# Altium PCB IMX8MMLPD4-CPU2_FULLY_PREPLACED_FANOUT.PcbDoc (part 3 of 3)
Units mil, origin at the board's own origin, x right, y up, seen from the top; angles counter-clockwise.
Board outline 2729.93 x 2000.03 mil, 8 copper layers (L1_PS, L2_GND_1, L3_IN1, L4_GND_2, L5_PWR_1, L6_PWR_2, L7_GND_3, L8_SS), stack 46.1 mil thick; 228 components, 321 nets, 1593 pads, 372 vias.
Unrouted connection lines stored in the file: 857.
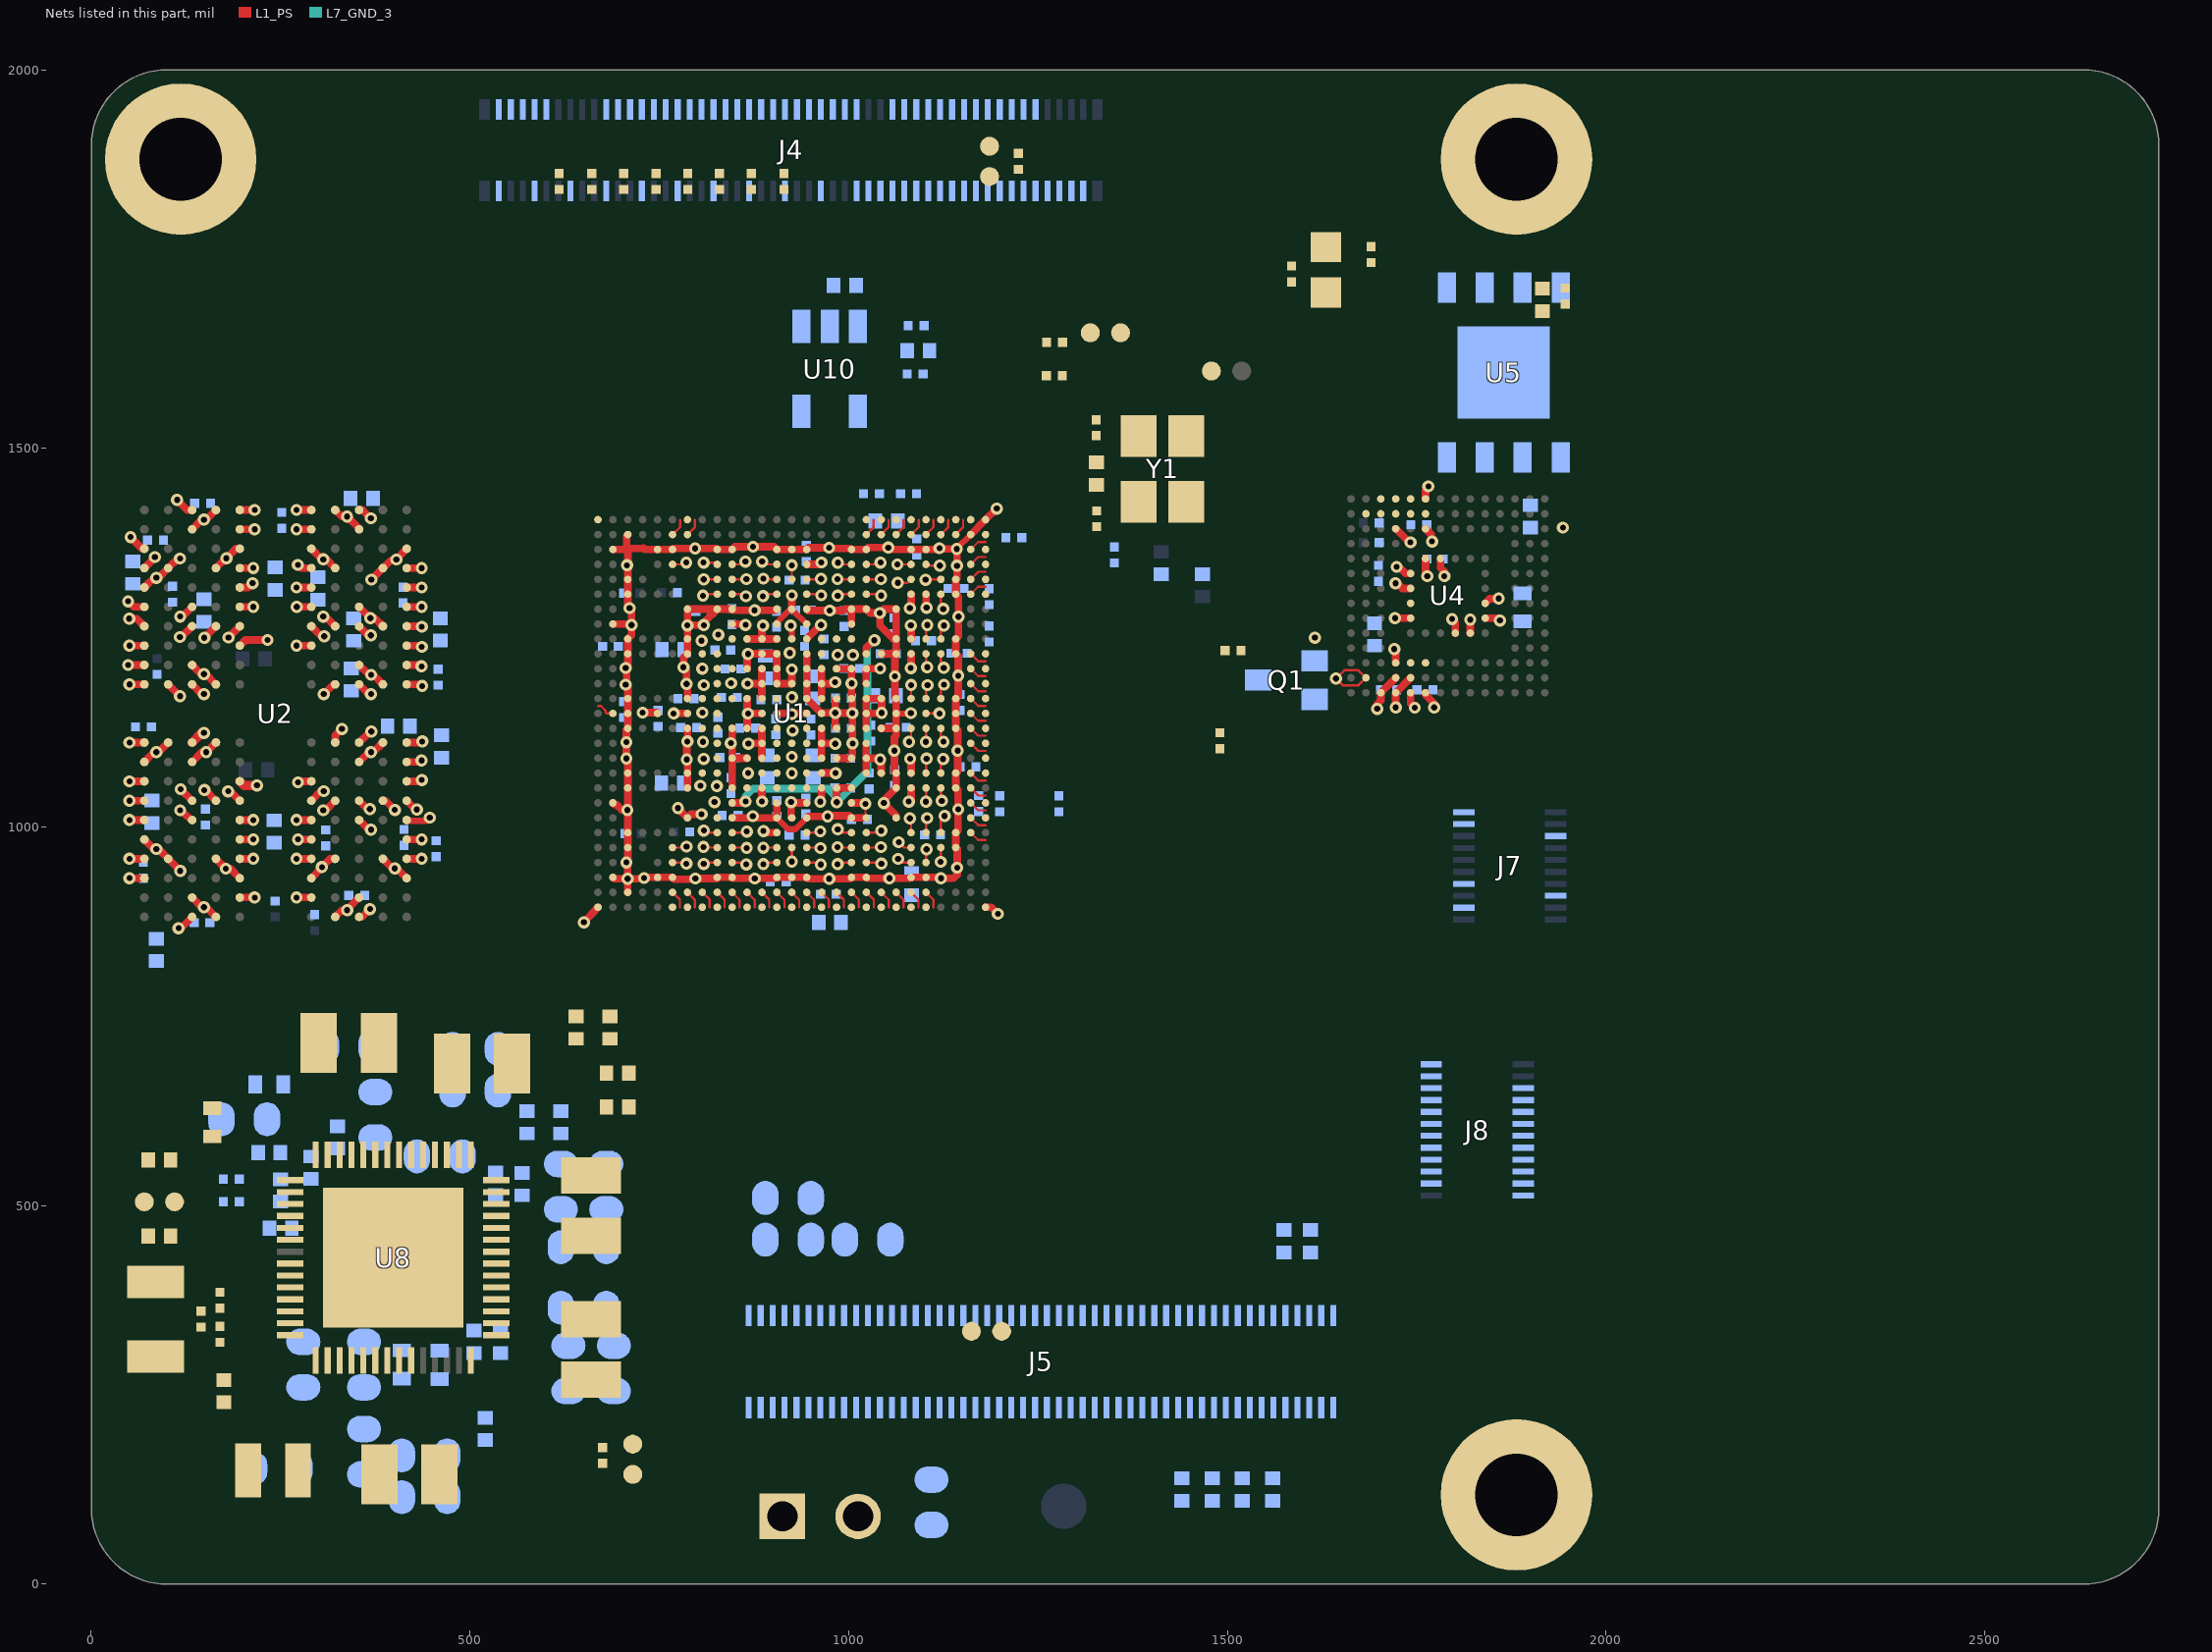
[diagram p5: the nets of this part, all layers, seen from the top]

## Via types
v1: diameter 16, hole 8, L1_PS to L8_SS, tented both sides, 325 vias
v2: diameter 16, hole 8, L1_PS to L8_SS, tented top, 47 vias

## Nets (pads, with @x,y where several pads share a name; then routed paths per layer and width w, separated by ;. In a path a pad name is that pad's centre, name@x,y a point inside that pad or via, vN(x,y) a via of type N, cw(c..) or ccw(c..) an arc to the next point about the centre after c; other vN are vias at no path point) (continued)
GND: BH1.1 BH2.1 BH3.1 C1.2 C2.2 C3.2 C5.2 C6.2 C8.2 C9.2 C10.2 C11.2 C12.2 C13.2 C15.2 C16.2 C17.2 C20.2 C21.2 C23.2 C30.2 C33.2 C35.2 C36.2 C48.2 C54.2 C55.2 C61.2 C65.2 C74.2 C78.2 C88.2 C89.2 C90.2 C91.2 C92.2 C93.2 C94.2 C95.2 C99.2 C100.2 C101.2 C104.2 C105.2 C106.2 C108.2 C109.2 C110.2 C111.2 C112.2 C113.2 C114.2 C115.2 C117.2 C118.2 C119.2 C123.2 C124.2 C127.2 C128.2 C129.2 C130.2 C131.2 C132.2 C133.2 C136.2 C137.2 C138.2 C139.2 C234.1 C235.2 C241.2 C244.2 C245.2 C247.2 C248.2 C251.2 C253.2 C254.2 C255.2 C256.2 C260.2 C264.2 C265.2 C266.2 C267.2 C268.2 C275.2 C279.1 C281.1 C283.2 C285.2 C287.2 C295.1 C298.2 C299.2 C301.1 C303.2 C304.2 C306.1 C307.1 C311.2 C312.2 C316.1 C317.2 C323.1 C324.2 C333.2 C337.2 C360.2 C363.2 C365.2 C370.2 C371.2 C372.2 C373.2 C374.2 C375.2 C376.2 C378.2 C379.2 C380.2 C381.2 C382.2 C384.2 C391.2 C392.2 C393.2 C394.2 C400.2 C401.1 C402.1 C403.2 C404.2 C405.2 C406.2 C407.1 C408.2 C410.2 J4.1 J4.7 J4.8 J4.13 J4.19 J4.20 J4.25 J4.31 J4.32 J4.37 J4.43 J4.44 J4.49 J4.55 J4.61 J4.67 J4.68 J4.73 J4.79 J4.80 J4.87 J4.92 J4.97 J5.9 J5.10 J5.11 J5.12 J5.13 J5.14 J5.15 J5.16 J5.17 J5.18 J5.19 J5.20 J5.47 J5.48 J5.60 J5.61 J5.72 J5.75 J5.84 J5.89 J5.96 J6.2 J7.3 J7.6 J7.7 J7.16 J7.17 J8.9 J8.10 J8.19 J8.20 Q1.2 R4.1 R7.1 R18.2 R23.2 R28.2 R29.2 R30.2 R103.2 R121.1 R122.1 R123.1 R124.1 R135.2 U1.A1 U1.A27 U1.AA7 U1.AA9 U1.AA10 U1.AA13 U1.AA15 U1.AA18 U1.AA19 U1.AA21 U1.AB3 U1.AB25 U1.AC3 U1.AC25 U1.AE2 U1.AE5 U1.AE6 U1.AE9 U1.AE10 U1.AE13 U1.AE14 U1.AE15 U1.AE18 U1.AE19 U1.AE22 U1.AE23 U1.AF3 U1.AG1 U1.AG27 U1.B3 U1.B26 U1.C2 U1.C5 U1.C6 U1.C9 U1.C10 U1.C13 U1.C14 U1.C15 U1.C18 U1.C19 U1.C22 U1.C23 U1.E3 U1.E25 U1.F3 U1.F25 U1.G7 U1.G9 U1.G10 U1.G13 U1.G15 U1.G18 U1.G19 U1.G21 U1.H2 U1.H18 U1.J3 U1.J7 U1.J21 U1.J25 U1.K3 U1.K7 U1.K20 U1.K21 U1.K25 U1.L12 U1.L16 U1.M12 U1.M16 U1.N3 U1.N7 U1.N12 U1.N16 U1.N21 U1.N25 U1.P3 U1.P13 U1.P15 U1.P21 U1.P25 U1.R3 U1.R7 U1.R12 U1.R16 U1.R20 U1.R21 U1.R25 U1.T12 U1.T16 U1.U12 U1.U16 U1.V3 U1.V7 U1.V21 U1.V25 U1.W3 U1.W7 U1.W21 U1.W25 U1.Y2 U1.Y13 U1.Y18 U2.A3 U2.A10 U2.AB3 U2.AB5 U2.AB8 U2.AB10 U2.C1 U2.C5 U2.C8 U2.C12 U2.D2 U2.D4 U2.D9 U2.D11 U2.E1 U2.E5 U2.E8 U2.E12 U2.G1 U2.G3 U2.G5 U2.G8 U2.G10 U2.G12 U2.J1 U2.J3 U2.J10 U2.J12 U2.K2 U2.K4 U2.K9 U2.K11 U2.N2 U2.N4 U2.N9 U2.N11 U2.P1 U2.P3 U2.P10 U2.P12 U2.T1 U2.T3 U2.T5 U2.T8 U2.T10 U2.T12 U2.V1 U2.V5 U2.V8 U2.V12 U2.W2 U2.W4 U2.W9 U2.W11 U2.Y1 U2.Y5 U2.Y8 U2.Y12 U4.A6 U4.C4 U4.E7 U4.G5 U4.H10 U4.J5 U4.K8 U4.N2 U4.N5 U4.P4 U4.P6 U5.4 U5.9 U8.5 U8.43 U8.57 U10.2 U10.4 Y1.2 Y1.4 | length 5097.9
  L1_PS w3: v1(1022.22,1030.58) 1022.22,1013.19 U1.AA19@1023.31,1012.1 ; v1(1643.48,1195.93) 1654.45,1206.9 1673,1206.9 U4.N2@1682.91,1196.99 1673.04,1187.12 1652.29,1187.12 v1(1643.48,1195.93)
  L1_PS w8: U1.AA13@905.21,1012.1 920.18,997.13 929.6,997.13 U1.AA15@944.57,1012.1 ; U1.P21@1062.69,1149.9 1081.68,1149.9 v1(1082.08,1150.3) ; v1(1142.66,1367.21) 1142.66,1367.67 U1.B26@1161.11,1386.12
  L1_PS w10: v1(48.68,1213.88) U2.P12@70.1,1213.88 ; v1(50.08,1275.14) 60.02,1275.14 U2.T12@70.1,1265.06 ; v1(50.41,932.38) U2.C12@70.1,932.38 ; v1(50.41,1034.74) U2.G12@70.1,1034.74 ; v1(51.89,1382.9) 67.37,1367.42 U2.Y12@70.1,1367.42 ; U2.E12@70.1,983.56 82.89,970.77 v1(85.85,970.77) 88.8,970.77 U2.D11@101.6,957.97 v2(117.5,942.07) ; U2.J12@70.1,1085.92 82.9,1098.72 v1(85.85,1098.72) 88.81,1098.72 U2.K11@101.6,1111.51 ; U2.V12@70.1,1316.24 82.89,1329.03 v1(85.85,1329.03) 88.8,1329.03 U2.W11@101.6,1341.83 114.31,1354.54 v2(117.22,1354.54) ; U2.N11@101.6,1188.29 v1(117.15,1172.74) ; v2(113.36,1431.9) 126.66,1418.6 U2.AB10@133.09,1418.6 ; v2(115.25,866.3) 118.19,866.3 U2.A10@133.09,881.2 ; v1(117.01,1250.89) 118.92,1250.89 U2.T10@133.09,1265.06 ; v1(118.03,1049.8) U2.G10@133.09,1034.74 ; U2.J10@133.09,1085.92 145.89,1098.72 v2(151.8,1098.72) U2.K9@164.59,1111.51 ; U2.P10@133.09,1213.88 145.07,1201.9 v2(148.89,1201.9) 149.71,1201.08 151.8,1201.08 U2.N9@164.59,1188.29 ; U2.D9@164.59,957.97 v2(177.64,944.92) 183.55,944.92 U2.C8@196.09,932.38 ; U2.W9@164.59,1341.83 177.64,1354.88 v2(178.41,1354.88) 190.95,1367.42 U2.Y8@196.09,1367.42 ; v1(180.76,1047.08) 183.75,1047.08 U2.G8@196.09,1034.74 ; v1(181.19,1250.16) U2.T8@196.09,1265.06 ; U2.E8@196.09,983.56 v1(213.84,983.56) ; U2.V8@196.09,1316.24 207.26,1316.24 v1(212.92,1321.9) ; U2.AB8@196.09,1418.6 v1(215.77,1418.6) ; v1(270.89,1316.24) U2.V5@290.57,1316.24 ; v1(270.89,1418.6) U2.AB5@290.57,1418.6 ; v1(272.82,983.56) U2.E5@290.57,983.56 ; U2.C5@290.57,932.38 304.47,946.28 v2(304.47,946.93) 315.51,957.97 U2.D4@322.07,957.97 ; U2.G5@290.57,1034.74 303.2,1047.37 v1(306.97,1047.37) ; U2.T5@290.57,1265.06 303.89,1251.74 v1(307.68,1251.74) ; U2.Y5@290.57,1367.42 304.59,1353.4 v2(306.19,1353.4) 310.5,1353.4 U2.W4@322.07,1341.83 ; v1(307,1175.49) 319.8,1188.29 U2.N4@322.07,1188.29 ; U2.K4@322.07,1111.51 322.07,1120.67 v1(330.86,1129.46) ; U2.A3@353.57,881.2 357.68,881.2 v1(368.01,891.53) ; U2.G3@353.57,1034.74 364.78,1023.53 v1(367.87,1023.53) ; U2.J3@353.57,1085.92 366.37,1098.72 v2(369.3,1098.72) 372.27,1098.72 U2.K2@385.06,1111.51 ; U2.P3@353.57,1213.88 366.37,1201.08 369.4,1201.08 v2(369.5,1200.98) 372.37,1200.98 U2.N2@385.06,1188.29 ; U2.T3@353.57,1265.06 365.56,1253.07 v1(369.24,1253.07) ; U2.AB3@353.57,1418.6 358.23,1418.6 v1(369.25,1407.58) ; v2(369.86,1326.63) U2.W2@385.06,1341.83 394.92,1351.69 398.24,1351.69 399.76,1353.21 v1(402.89,1353.21) 402.89,1353.75 U2.Y1@416.56,1367.42 ; U2.D2@385.06,957.97 397.85,945.18 v1(400.81,945.18) 403.76,945.18 U2.C1@416.56,932.38 ; U2.E1@416.56,983.56 v1(436.24,983.56) ; U2.G1@416.56,1034.74 428.23,1023.07 429.86,1023.07 v1(429.9,1023.03) ; U2.J1@416.56,1085.92 434.24,1085.92 v2(436.06,1087.74) ; U2.P1@416.56,1213.88 434.24,1213.88 v2(436.06,1212.06) ; U2.T1@416.56,1265.06 435.61,1265.06 v1(436.35,1264.32) ; U2.V1@416.56,1316.24 v1(436.24,1316.24) ; v1(650.54,874.07) U1.AG1@668.98,893.99 ; U1.AE2@688.67,933.36 690.5,931.53 v1(708.21,931.53) ; U1.Y2@688.67,1031.79 691.1,1029.36 693.62,1029.36 700.76,1022.22 v1(707.81,1022.22) ; U1.H2@688.67,1268.01 712.03,1268.01 v1(713.39,1266.65) ; U1.C2@688.67,1366.44 705.29,1366.44 706.77,1367.92 ; v1(707.31,1345.6) v1@708.35,1344.56 ; U1.AF3@708.35,913.68 708.21,913.82 v1(708.21,931.53) ; U1.B3@708.35,1386.12 706.77,1384.54 706.77,1367.92 ; v1(774.61,1024.87) 774.61,1024.58 U1.AA7@787.09,1012.1 791.72,1016.73 v1(805.89,1016.73) ; U1.W7@787.09,1051.48 U1.V7@787.09,1071.16 787.09,1088.14 v1(786.24,1088.99) 786.24,1112.05 v1(787.09,1112.9) U1.R7@787.09,1130.22 ; U1.N7@787.09,1169.58 787.09,1187.7 v1(785.89,1188.9) 785.89,1206.9 v1(781.89,1210.9) 781.89,1223.44 U1.K7@787.09,1228.64 U1.J7@787.09,1248.32 v1(787.09,1266.17) ; U1.AA10@846.15,1012.1 871.44,1012.1 v1(873.5,1014.16) 875.56,1012.1 U1.AA13@905.21,1012.1 U1.Y13@905.21,1031.79 ; v1(866.44,1189.27) U1.M12@885.52,1189.27 ; v1(867.54,1109.96) 868.11,1110.53 U1.T12@885.52,1110.53 ; U1.U12@885.52,1090.84 U1.T12@885.52,1110.53 ; U1.R12@885.52,1130.22 U1.T12@885.52,1110.53 ; U1.N12@885.52,1169.58 U1.M12@885.52,1189.27 ; U1.L12@885.52,1208.96 U1.M12@885.52,1189.27 ; U1.P13@905.21,1149.9 924.23,1149.9 v1(925.04,1149.09) 925.85,1149.9 U1.P15@944.57,1149.9 ; U1.G13@905.21,1287.7 903.55,1286.04 v1(875.81,1286.04) 847.81,1286.04 U1.G10@846.15,1287.7 U1.G9@826.47,1287.7 ; U1.AA15@944.57,1012.1 946.35,1013.88 v1(972.2,1013.88) 973.2,1014.88 1000.85,1014.88 U1.AA18@1003.63,1012.1 U1.AA19@1023.31,1012.1 ; U1.G15@944.57,1287.7 946.39,1285.88 v1(974.96,1285.88) 992.84,1285.88 994.66,1287.7 U1.G18@1003.63,1287.7 ; U1.U16@964.26,1090.84 U1.T16@964.26,1110.53 ; U1.R16@964.26,1130.22 U1.T16@964.26,1110.53 ; U1.N16@964.26,1169.58 U1.M16@964.26,1189.27 ; U1.L16@964.26,1208.96 U1.M16@964.26,1189.27 ; v1(982.18,1191.15) 980.3,1189.27 U1.M16@964.26,1189.27 ; v1(982.4,1109.84) 981.71,1110.53 U1.T16@964.26,1110.53 ; U1.Y18@1003.63,1031.79 1021.01,1031.79 v1(1022.22,1030.58) ; U1.H18@1003.63,1268.01 U1.G18@1003.63,1287.7 ; U1.R20@1043,1130.22 U1.R21@1062.69,1130.22 ; U1.K20@1043,1228.64 U1.K21@1062.69,1228.64 ; U1.AA21@1062.69,1012.1 1062.69,1015.3 v1(1046.43,1031.56) 1046.43,1035.22 U1.W21@1062.69,1051.48 U1.V21@1062.69,1071.16 1060.27,1073.57 v1(1060.27,1100.65) 1060.27,1118.35 1062.69,1120.77 U1.R21@1062.69,1130.22 ; 1144.37,1007.92 1144.37,995.36 U1.AB25@1141.43,992.42 U1.AC25@1141.43,972.74 1143.26,970.9 v1(1143.26,946.08) 1143.26,937.14 1138.44,932.32 v1(1121.84,932.32) 1120.79,933.36 U1.AE23@1102.05,933.36 U1.AE22@1082.37,933.36 1081.25,932.27 v1(1053.8,932.27) 1024.4,932.27 U1.AE19@1023.31,933.36 U1.AE18@1003.63,933.36 1001.78,931.51 v1(974.35,931.51) 946.43,931.51 U1.AE15@944.57,933.36 U1.AE14@924.89,933.36 U1.AE13@905.21,933.36 903.93,932.09 876.14,932.09 v1(876.04,931.99) 875.94,932.09 847.43,932.09 U1.AE10@846.15,933.36 U1.AE9@826.47,933.36 825.04,931.94 v1(797.52,931.94) 796.56,930.98 769.79,930.98 U1.AE6@767.41,933.36 U1.AE5@747.73,933.36 730.65,933.36 v1(729.89,932.6) 728.82,931.53 v1(708.21,931.53) ; 1144.4,1007.95 1144.4,1022.32 1144.68,1022.6 v1(1144.68,1023.33) 1144.68,1025.06 1144.37,1025.37 1144.37,1048.53 U1.W25@1141.43,1051.48 U1.V25@1141.43,1071.16 1143.89,1073.62 v1(1143.89,1100.69) 1143.89,1127.75 U1.R25@1141.43,1130.22 U1.P25@1141.43,1149.9 U1.N25@1141.43,1169.58 1144.67,1172.83 v1(1144.67,1199.77) 1144.67,1225.4 U1.K25@1141.43,1228.64 U1.J25@1141.43,1248.32 1144.93,1251.82 v1(1144.93,1277.76) 1144.93,1303.88 U1.F25@1141.43,1307.38 U1.E25@1141.43,1327.06 1142.96,1328.59 v1(1142.96,1344.93) 1142.96,1366.91 v1(1142.66,1367.21) 1120.68,1367.21 v1(1119.86,1368.03) 1118.27,1366.44 U1.C23@1102.05,1366.44 U1.C22@1082.37,1366.44 1054.72,1366.44 v1(1052.24,1368.92) 1025.79,1368.92 U1.C19@1023.31,1366.44 U1.C18@1003.63,1366.44 1002.39,1367.68 975.18,1367.68 v1(974.11,1368.75) 946.89,1368.75 U1.C15@944.57,1366.44 U1.C14@924.89,1366.44 U1.C13@905.21,1366.44 901.51,1370.14 v1(873.8,1370.14) 849.85,1370.14 U1.C10@846.15,1366.44 U1.C9@826.47,1366.44 825.09,1367.81 v1(797.23,1367.81) 768.78,1367.81 U1.C6@767.41,1366.44 U1.C5@747.73,1366.44 730.92,1366.44 729.11,1368.25 728.78,1367.92 706.77,1367.92 ; U1.B26@1161.11,1386.12 U1.A27@1180.8,1405.81 v1(1195.49,1420.5) ; U1.AG27@1180.8,893.99 1188.24,893.99 v1(1197.01,885.22) ; v1(1721.33,1275.73) U4.J5@1741.97,1275.73 ; v1(1721.96,1321.79) 1724.27,1321.79 1730.96,1315.1 U4.G5@1741.97,1315.1 ; v1(1722.28,1157.86) U4.P4@1722.28,1177.31 U4.N5@1741.97,1196.99 ; U4.C4@1722.28,1393.84 1740.13,1375.99 v1(1741.72,1375.99) ; U4.P6@1761.65,1177.31 1761.65,1174.61 1773.14,1163.12 v1(1773.14,1157.71) ; U4.A6@1761.65,1433.21 1761.65,1444.35 1765.41,1448.11 v1(1765.41,1449.79) ; U4.E7@1781.34,1354.47 1781.34,1342.08 1786.48,1336.94 v1(1786.48,1331.16) ; v1(1796.79,1274.61) 1801.02,1270.38 U4.K8@1801.02,1256.05 ; U4.H10@1840.39,1295.42 1846.27,1301.3 1857.95,1301.3 v1(1858.22,1301.57) ; 706.77,1367.92 708.35,1366.34 v1@708.35,1344.56 ; v1(707.81,1022.22) 708.35,1021.68 U1.AB3@708.35,992.42 U1.AC3@708.35,972.74 708.35,954.97 v1(706.55,953.17) 708.21,951.51 v1(708.21,931.53) ; v1(707.81,1022.22) 708.35,1022.76 U1.W3@708.35,1051.48 U1.V3@708.35,1071.16 708.35,1085.47 706.86,1086.96 706.86,1088.51 706.64,1088.73 706.64,1090.24 v1(706.52,1090.36) v1(706.52,1111.9) 706.52,1128.39 U1.R3@708.35,1130.22 U1.P3@708.35,1149.9 U1.N3@708.35,1169.58 708.35,1185.17 v1(705.62,1187.9) 706.89,1189.17 706.89,1208.7 v1(705.65,1209.94) 708.35,1212.64 U1.K3@708.35,1228.64 U1.J3@708.35,1248.32 713.39,1253.36 v1(713.39,1266.65) ; v1@708.35,1344.56 U1.E3@708.35,1327.06 U1.F3@708.35,1307.38 708.35,1291.57 v1(710.84,1289.08) 713.39,1286.53 v1(713.39,1266.65) ; v1(787.09,1266.17) 787.47,1266.55 v1(808.81,1266.55) 808.81,1270.04 U1.G9@826.47,1287.7 ; v1(787.09,1266.17) U1.G7@787.09,1287.7 U1.G9@826.47,1287.7 ; U1.G18@1003.63,1287.7 U1.G19@1023.31,1287.7 1028.49,1282.52 v1(1041.12,1282.52) ; v1(1041.12,1282.52) 1046.3,1287.7 U1.G21@1062.69,1287.7 U1.J21@1062.69,1248.32 ; v1(1041.12,1282.52) 1041.12,1265.89 1058.69,1248.32 U1.J21@1062.69,1248.32 ; U1.R21@1062.69,1130.22 U1.P21@1062.69,1149.9 U1.N21@1062.69,1169.58 1061.04,1171.23 v1(1061.04,1198.96) 1061.04,1226.99 U1.K21@1062.69,1228.64 ; U1.K21@1062.69,1228.64 U1.J21@1062.69,1248.32
  other v1: 822.89,1032.9
GPIO1_IO01: J5.64 U1.AF14 | length 23.8
  L1_PS w3: U1.AF14@924.89,913.68 934.75,903.82 934.75,893.99
GPIO1_IO05: J5.62 U1.AF12 | length 23.7
  L1_PS w3: U1.AF12@885.52,913.68 895.22,903.98 895.22,893.99
GPIO1_IO06: J5.58 U1.AG11
GPIO1_IO07: J5.56 U1.AF11 | length 23.8
  L1_PS w3: U1.AF11@865.83,913.68 875.82,903.7 875.82,893.99
GPIO1_IO08: J5.54 U1.AG10
GPIO1_IO09: J5.52 U1.AF10 | length 23.8
  L1_PS w3: U1.AF10@846.15,913.68 856.04,903.79 856.04,893.99
GPIO1_IO10: J5.50 U1.AD10 | length 19.7
  L1_PS w3: U1.AD10@846.15,953.05 862.35,953.05 v1(864.82,950.58)
GPIO1_IO11: J5.46 U1.AC10 | length 19.4
  L1_PS w3: U1.AC10@846.15,972.74 864.88,972.74 v1(865.33,972.28)
GPIO1_IO12: J5.44 U1.AB10 | length 20
  L1_PS w3: U1.AB10@846.15,992.42 863.94,992.42 v1(865.5,993.98)
GPIO1_IO13: J5.42 U1.AD9 | length 18.7
  L1_PS w3: v1(808.5,951.18) 810.36,953.05 U1.AD9@826.47,953.05
GPIO1_IO14: J5.40 U1.AC9 | length 18.4
  L1_PS w3: v1(808.37,973.5) 809.13,972.74 U1.AC9@826.47,972.74
GPIO1_IO15: J5.38 U1.AB9 | length 18.9
  L1_PS w3: v1(808.77,995.22) 811.57,992.42 U1.AB9@826.47,992.42
I2C1_SCL: R10.2 R48.1 U1.E9 | length 17.9
  L1_PS w3: v1(808.62,1327.06) U1.E9@826.47,1327.06
I2C1_SDA: R11.2 R54.1 U1.F9 | length 19.6
  L1_PS w3: v1(807.68,1305.38) 809.68,1307.38 U1.F9@826.47,1307.38
I2C2_SCL: J4.22 R12.2 U1.D10 | length 19
  L1_PS w3: U1.D10@846.15,1346.75 859.98,1346.75 v1(863.67,1350.44)
I2C2_SDA: J4.24 R13.2 U1.D9 | length 19.1
  L1_PS w3: v1(808.41,1349.15) 824.07,1349.15 U1.D9@826.47,1346.75
I2C3_SCL: J4.26 R14.2 U1.E10 | length 18.9
  L1_PS w3: U1.E10@846.15,1327.06 864.64,1327.06 v1(864.93,1327.36)
I2C3_SDA: J4.28 R15.2 U1.F10 | length 19.3
  L1_PS w3: U1.F10@846.15,1307.38 861.61,1307.38 v1(864.35,1304.65)
I2C4_SCL: J4.30 R16.2 U1.D13 | length 21
  L1_PS w3: v1(885.75,1350.42) 889.42,1346.75 U1.D13@905.21,1346.75
I2C4_SDA: J4.34 R17.2 U1.E13 | length 18.3
  L1_PS w3: v1(887.28,1327.98) 888.2,1327.06 U1.E13@905.21,1327.06
JTAG_MOD: R23.1 U1.D27
JTAG_NTRST: J4.60 U1.C27
JTAG_TCK: J4.62 R18.1 U1.F26 | length 23.7
  L1_PS w3: U1.F26@1161.11,1307.38 1170.86,1317.13 1180.8,1317.13
JTAG_TDI: J4.54 U1.E27
JTAG_TDO: J4.52 U1.E26 | length 23.8
  L1_PS w3: U1.E26@1161.11,1327.06 1171.1,1337.05 1180.8,1337.05
JTAG_TMS: J4.58 U1.F27
LX1: L5.1 U8.36 U8.37
LX2: L6.1 U8.45 U8.46
LX3: L10.1 U8.31 U8.32
LX4: L11.1 U8.19 U8.20
LX5: L13.1 U8.15
M.2_32K_OUT: J5.37 R116.2
NC1: U1.J18
NetC245_1: C245.1 U1.R22 | length 19
  L1_PS w3: v1(1079.64,1112.35) 1082.37,1115.08 U1.R22@1082.37,1130.22
NetC268_1: C268.1 U1.D15 | length 20.4
  L1_PS w10: U1.D15@944.57,1346.75 961.38,1346.75 v1(963.95,1349.32)
NetD1_A: D1.A R125.2
NetD1_C: D1.C Q1.3
NetL15_1: L15.1 U8.50 U8.51
NetR7_2: R7.2 U1.P2 | length 25.1
  L1_PS w3: 668.98,1159.74 673.06,1159.74 678.82,1153.98 678.82,1151.65 680.58,1149.89 U1.P2@688.67,1149.9
NetR28_1: R28.1 U1.D19 | length 19.8
  L1_PS w3: U1.D19@1023.31,1346.75 1039.36,1346.75 1041.72,1349.11 v1(1042.09,1349.11)
NetR29_1: R29.1 U1.E19 | length 19.4
  L1_PS w3: U1.E19@1023.31,1327.06 1042.27,1327.06 v1(1042.59,1327.38)
NetR30_1: R30.1 U1.E22 | length 19.5
  L1_PS w3: v1(1064.78,1322.36) 1077.67,1322.36 U1.E22@1082.37,1327.06
NetR48_2: R48.2 U8.41
NetR51_2: R51.2 U8.39
NetR52_2: R52.2 U8.40
NetR54_2: R54.2 U8.42
NetR55_2: R55.2 R106.2 U8.28
NetR108_1: R108.1 U1.F22 | length 19.1
  L1_PS w10: v1(1080.89,1288.9) 1082.37,1290.38 U1.F22@1082.37,1307.38
NetR109_1: R109.1 U1.F23 | length 18.2
  L1_PS w10: U1.F23@1102.05,1307.38 1102.05,1290.4 v1(1102.9,1289.55)
NetR111_1: R111.1 U8.6
NetR114_1: R114.1 U8.9
NetR127_2: R127.2 U8.8
NetR146_2: R146.2 U8.12
NVCC_DRAM_1V1: C88.1 C89.1 C90.1 C91.1 C92.1 C93.1 C94.1 C95.1 C110.1 C111.1 C112.1 C113.1 C114.1 C115.1 C117.1 C118.1 C119.1 C324.1 C373.1 C374.1 C375.1 C376.1 C378.1 C379.1 C380.1 C381.1 C382.1 L15.2 R5.1 R6.1 U1.K8 U1.K9 U1.L9 U1.M9 U1.N8 U1.N9 U1.P7 U1.R8 U1.R9 U1.T9 U1.U9 U1.V8 U1.V9 U2.A4 U2.A9 U2.AA3 U2.AA5 U2.AA8 U2.AA10 U2.AB4 U2.AB9 U2.B3 U2.B5 U2.B8 U2.B10 U2.D1 U2.D5 U2.D8 U2.D12 U2.F3 U2.F5 U2.F8 U2.F10 U2.G2 U2.H1 U2.H5 U2.H8 U2.H12 U2.K1 U2.K3 U2.K10 U2.K12 U2.N1 U2.N3 U2.N10 U2.N12 U2.R1 U2.R5 U2.R8 U2.R12 U2.T2 U2.U3 U2.U5 U2.U8 U2.U10 U2.W1 U2.W5 U2.W8 U2.W12 U8.52 | length 970.5
  L1_PS w10: v1(50.41,957.97) U2.D12@70.1,957.97 ; v1(50.41,1060.33) U2.H12@70.1,1060.33 ; v1(50.41,1111.51) U2.K12@70.1,1111.51 ; v1(50.41,1188.29) U2.N12@70.1,1188.29 ; v1(50.41,1239.47) U2.R12@70.1,1239.47 ; U2.W12@70.1,1341.83 84.04,1355.77 v1(84.04,1356.43) ; v1(117.34,1021.95) U2.F10@133.09,1009.15 ; v1(117.34,1277.85) 120.29,1277.85 U2.U10@133.09,1290.65 ; U2.B10@133.09,906.79 145.89,893.99 v1(148.84,893.99) 151.8,893.99 U2.A9@164.59,881.2 ; U2.N10@133.09,1188.29 145.89,1175.49 v1(148.84,1175.49) ; U2.AA10@133.09,1393.01 145.89,1405.81 v1(148.84,1405.81) 151.8,1405.81 U2.AB9@164.59,1418.6 ; U2.B8@196.09,906.79 v1(215.77,906.79) ; U2.D8@196.09,957.97 v1(213.84,957.97) ; U2.F8@196.09,1009.15 v1(213.84,1009.15) ; U2.R8@196.09,1239.47 203.52,1246.9 v1(232.65,1246.9) ; U2.U8@196.09,1290.65 v1(213.84,1290.65) ; U2.W8@196.09,1341.83 213.64,1341.83 v1(213.84,1342.03) ; U2.AA8@196.09,1393.01 v1(215.77,1393.01) ; v1(270.89,906.79) U2.B5@290.57,906.79 ; v1(270.89,957.97) U2.D5@290.57,957.97 ; v1(270.89,1009.15) U2.F5@290.57,1009.15 ; v1(270.89,1239.47) U2.R5@290.57,1239.47 ; v1(270.89,1393.01) U2.AA5@290.57,1393.01 ; v1(271.39,1290.65) U2.U5@290.57,1290.65 ; v1(272.81,1346) 276.98,1341.83 U2.W5@290.57,1341.83 ; v1(272.88,1058.86) 274.35,1060.33 U2.H5@290.57,1060.33 ; U2.A4@322.07,881.2 330.91,890.04 v1(337.94,890.04) 337.94,891.16 U2.B3@353.57,906.79 ; U2.AB4@322.07,1418.6 330.76,1409.91 v1(337.78,1409.91) 353.57,1394.12 U2.AA3@353.57,1393.01 ; U2.F3@353.57,1009.15 366.36,996.36 v1(369.31,996.36) ; U2.K3@353.57,1111.51 366.37,1124.31 368.06,1124.31 v1(369.83,1126.08) ; U2.N3@353.57,1188.29 366.37,1175.49 v1(369.31,1175.49) ; U2.U3@353.57,1290.65 v1(368.56,1275.66) 374.46,1275.66 U2.T2@385.06,1265.06 ; U2.G2@385.06,1034.74 388.61,1034.74 v1(400.81,1022.54) ; U2.D1@416.56,957.97 v1(436.24,957.97) ; U2.H1@416.56,1060.33 434.64,1060.33 v1(436.35,1062.04) ; U2.K1@416.56,1111.51 434.71,1111.51 436.14,1112.94 v1(437.04,1112.94) ; U2.N1@416.56,1188.29 434.71,1188.29 v1(436.83,1186.17) ; U2.R1@416.56,1239.47 434.64,1239.47 v1(436.35,1237.76) ; U2.W1@416.56,1341.83 v1(436.24,1341.83) ; v1(768.89,1149.9) U1.P7@787.09,1149.9
  L1_PS w12: U2.K10@133.09,1111.51 145.89,1124.31 v1(148.84,1124.31) ; U2.H8@196.09,1060.33 201.52,1054.9 v1(218.89,1054.9)
  other v1: 825.89,1053.9 804.18,1054.36 808.62,1089.9 807.54,1112.38 806.78,1151.05 808.72,1187.34 806.78,1209.14 805.89,1245.9 827.89,1253.9
NVCC_ENET: C2.1 C392.1 J7.19 U1.W22 | length 19.2
  L1_PS w10: v1(1079.41,1033.53) 1082.37,1036.49 U1.W22@1082.37,1051.48
NVCC_SD2: C17.1 C365.1 R119.1 R120.1 R133.1 U1.V22 U8.55 | length 19.4
  L1_PS w10: v1(1081.23,1090.09) 1082.37,1088.95 U1.V22@1082.37,1071.16
NVCC_SNVS_1V8: C333.1 C391.1 R20.1 R21.1 R102.1 U1.J22 U8.3 | length 17.9
  L1_PS w10: v1(1082.17,1266.18) 1082.37,1265.98 U1.J22@1082.37,1248.32
ONOFF: J4.46 R21.2 U1.A25
PCIE_CLK_N: J4.75 U1.A21
PCIE_CLK_P: J4.77 U1.B21 | length 23.7
  L1_PS w3: U1.B21@1062.69,1386.12 1072.39,1395.82 1072.39,1405.81
PCIE_RX_N: J4.63 U1.A19
PCIE_RX_P: J4.65 U1.B19 | length 23.7
  L1_PS w3: U1.B19@1023.31,1386.12 1033.02,1395.82 1033.02,1405.81
PCIE_TX_N: J4.69 U1.A20
PCIE_TX_P: J4.71 U1.B20 | length 23.7
  L1_PS w3: U1.B20@1043,1386.12 1052.71,1395.82 1052.71,1405.81
PDM_CLK: J5.65 U1.AC15 | length 18.6
  L1_PS w3: U1.AC15@944.57,972.74 962.18,972.74 v1(962.88,972.04)
PDM_DATA0: J5.67 U1.AD18 | length 19.2
  L1_PS w3: v1(985.36,950.88) 987.53,953.05 U1.AD18@1003.63,953.05
PDM_DATA1: J5.69 U1.AC14 | length 18.5
  L1_PS w4: v1(924.89,954.26) U1.AC14@924.89,972.74
PDM_DATA2: J5.71 U1.AD13 | length 18.8
  L1_PS w3: v1(887.32,950.87) 889.5,953.05 U1.AD13@905.21,953.05
PDM_DATA3: J5.73 U1.AC13 | length 17.9
  L1_PS w3: v1(887.35,972.58) 887.5,972.74 U1.AC13@905.21,972.74
PMIC_NINT: U1.AF13 U8.13 | length 23.8
  L1_PS w3: U1.AF13@905.21,913.68 915.16,903.72 915.16,893.99
PMIC_ON_REQ: J4.48 R51.1 U1.A24
PMIC_STBY_REQ: R52.1 U1.E24 | length 20.4
  L1_PS w3: v1(1101.58,1326.51) 1102.13,1327.06 U1.E24@1121.74,1327.06
POR_B: J4.50 R20.2 R114.2 U1.B24 | length 23.8
  L1_PS w3: U1.B24@1121.74,1386.12 1131.56,1395.93 1131.56,1405.81
QSPIA_DATA0: U1.P23 U5.5 | length 17.9
  L1_PS w3: U1.P23@1102.05,1149.9 v1(1119.9,1149.9)
QSPIA_DATA1: U1.K24 U5.2 | length 20
  L1_PS w3: U1.K24@1121.74,1228.64 1121.74,1213.9 v1(1125.48,1210.16)
QSPIA_DATA2: U1.K23 U5.3 | length 18.5
  L1_PS w3: U1.K23@1102.05,1228.64 1102.05,1212.48 v1(1103.67,1210.86)
QSPIA_DATA3: U1.N23 U5.7 | length 18.6
  L1_PS w3: U1.N23@1102.05,1169.58 1102.05,1185.11 v1(1104.24,1187.3)
QSPIA_NSS0: R37.2 U1.N24 U5.1 | length 20
  L1_PS w3: U1.N24@1121.74,1169.58 1121.74,1183.63 v1(1125.97,1187.86)
QSPIA_SCLK: U1.N22 U5.6 | length 17.9
  L1_PS w3: U1.N22@1082.37,1169.58 v1(1082.37,1187.47)
R_SNSP1: R142.2 R143.1 U8.38
R_SNSP2: R140.2 R141.1 U8.44
R_SNSP3_CFG: R144.2 R145.1 U8.30
REF_CLK_32K: R116.1 U1.AG14
RTC_RESET_B: R102.2 R111.2 U1.F24 | length 20.8
  L1_PS w3: U1.F24@1121.74,1307.38 1121.74,1291 v1(1124.88,1287.85)
SAI1_MCLK: J5.98 U1.AB18 | length 19.8
  L1_PS w3: v1(985.65,996.85) 990.08,992.42 U1.AB18@1003.63,992.42
SAI1_RXC: J5.76 U1.AF16 | length 23.7
  L1_PS w3: U1.AF16@964.26,913.68 973.97,903.97 973.97,893.99
SAI1_RXD0: J5.78 U1.AG15
SAI1_RXD1: J5.80 R76.1 U1.AF15 | length 23.8
  L1_PS w3: U1.AF15@944.57,913.68 954.56,903.7 954.56,893.99
SAI1_RXD2: J5.82 R75.1 U1.AG17
SAI1_RXD3: J5.86 U1.AF17 | length 23.7
  L1_PS w3: U1.AF17@983.95,913.68 993.65,903.98 993.65,893.99
SAI1_RXD4: J5.88 U1.AG18
SAI1_RXD5: J5.90 R72.1 U1.AF18 | length 23.8
  L1_PS w3: U1.AF18@1003.63,913.68 1013.61,903.7 1013.61,893.99
SAI1_RXD6: J5.92 R71.1 U1.AG19
SAI1_RXD7: J5.94 U1.AF19 | length 23.7
  L1_PS w3: U1.AF19@1023.31,913.68 1033.09,903.9 1033.09,893.99
SAI1_RXFS: J5.74 U1.AG16
SAI1_TXC: J5.81 U1.AC18 | length 18.6
  L1_PS w3: v1(985.28,973.38) 985.92,972.74 U1.AC18@1003.63,972.74
SAI1_TXD0: J5.83 U1.AG20
SAI1_TXD1: J5.85 U1.AF20 | length 23.8
  L1_PS w3: U1.AF20@1043,913.68 1052.85,903.83 1052.85,893.99
SAI1_TXD2: J5.87 U1.AG21
SAI1_TXD3: J5.91 R97.1 U1.AF21 | length 23.7
  L1_PS w3: U1.AF21@1062.69,913.68 1072.44,903.92 1072.44,893.99
SAI1_TXD4: J5.93 U1.AG22
SAI1_TXD5: J5.95 R95.1 U1.AF22 | length 23.8
  L1_PS w3: U1.AF22@1082.37,913.68 1092.21,903.84 1092.21,893.99
SAI1_TXD6: J5.97 U1.AG23
SAI1_TXD7: J5.99 U1.AF23 | length 23.7
  L1_PS w3: U1.AF23@1102.05,913.68 1111.8,903.94 1111.8,893.99
SAI1_TXFS: J5.100 U1.AB19 | length 20.8
  L1_PS w3: U1.AB19@1023.31,992.42 1040.32,992.42 v1(1043.02,995.12)
SAI2_MCLK: J5.66 U1.AD19 | length 20.5
  L1_PS w3: U1.AD19@1023.31,953.05 1039.04,953.05 1040.57,951.52 v1(1043.2,951.52)
SAI2_RXC: J5.79 U1.AB22 | length 19.4
  L1_PS w3: v1(1080.86,1011.21) 1082.37,1009.7 U1.AB22@1082.37,992.42
SAI2_RXD: J8.23 U1.AC24 | length 18.8
  L1_PS w3: v1(1121.54,954.02) 1121.74,954.22 U1.AC24@1121.74,972.74
SAI2_RXFS: J5.68 U1.AC19 | length 19.7
  L1_PS w3: U1.AC19@1023.31,972.74 1042.01,972.74 v1(1042.69,973.42)
SAI2_TXC: J8.21 U1.AD22 | length 19.2
  L1_PS w3: v1(1065.2,957.93) 1070.08,953.05 U1.AD22@1082.37,953.05
SAI2_TXD: J8.17 U1.AC22 | length 19.3
  L1_PS w3: v1(1066.04,979.95) 1073.25,972.74 U1.AC22@1082.37,972.74
SAI2_TXFS: J8.15 U1.AD23 | length 17.8
  L1_PS w3: U1.AD23@1102.05,953.05 1102.05,966.16 1102.89,967 v1(1102.89,970.5)
SAI3_MCLK: J5.41 U1.AD6 | length 18.9
  L1_PS w3: U1.AD6@767.41,953.05 782.06,953.05 783.59,951.52 v1(785.71,951.52)
SAI3_RXC: J5.53 U1.AG7
SAI3_RXD: J5.55 U1.AF7 | length 23.7
  L1_PS w3: U1.AF7@787.09,913.68 796.79,903.98 796.79,893.99
SAI3_RXFS: J5.51 U1.AG8
SAI3_TXC: J5.45 U1.AG6
SAI3_TXD: J5.49 U1.AF6 | length 23.7
  L1_PS w3: U1.AF6@767.41,913.68 777.11,903.98 777.11,893.99
SAI3_TXFS: J5.43 U1.AC6 | length 19.1
  L1_PS w3: U1.AC6@767.41,972.74 784.56,972.74 v1(785.96,974.14)
SAI5_MCLK: J5.77 U1.AD15 | length 19.8
  L1_PS w3: U1.AD15@944.57,953.05 960.29,953.05 963.01,950.33 v1(963.23,950.33)
SAI5_RXFS: J5.70 U1.AB15 | length 18.6
  L1_PS w3: U1.AB15@944.57,992.42 960.78,992.42 v1@962.08,993.72
  L1_PS w3.3: v1@962.08,993.72 v1(962.49,994.13)
SD1_CLK: J8.22 U1.V26 | length 23.8
  L1_PS w3: U1.V26@1161.11,1071.16 1171.09,1061.18 1180.8,1061.18
SD1_CMD: J8.18 U1.V27
SD1_DATA0: J8.8 U1.Y27
SD1_DATA1: J8.12 U1.Y26 | length 23.7
  L1_PS w3: U1.Y26@1161.11,1031.79 1170.81,1022.09 1180.8,1022.09
SD1_DATA2: J8.14 U1.T27
SD1_DATA3: J8.16 U1.T26 | length 23.8
  L1_PS w3: U1.T26@1161.11,1110.53 1171.1,1100.54 1180.8,1100.54
SD1_STROBE: J4.70 U1.R24 | length 19.1
  L1_PS w3: U1.R24@1121.74,1130.22 1121.74,1115.99 v1(1125.18,1112.55)
SD2_CLK: J4.76 U1.W23 | length 18.2
  L1_PS w3: v1(1102.06,1033.31) U1.W23@1102.05,1051.48
SD2_CMD: J4.78 R120.2 U1.W24 | length 17.5
  L1_PS w3: U1.W24@1121.74,1051.48 1121.74,1035.81 v1(1123.03,1034.52)
SD2_DATA0: J4.84 R119.2 U1.AB23 | length 19.9
  L1_PS w3: U1.AB23@1102.05,992.42 1102.05,1010.06 v1(1103.65,1011.66)
SD2_DATA1: J4.82 U1.AB24 | length 24.3
  L1_PS w3: U1.AB24@1121.74,992.42 1121.74,1009.72 v1(1126.66,1014.64)
SD2_DATA2: J4.72 U1.V24 | length 19.8
  L1_PS w3: U1.V24@1121.74,1071.16 1121.74,1086.83 v1(1124.69,1089.78)
SD2_DATA3: J4.74 U1.V23 | length 19.4
  L1_PS w3: U1.V23@1102.05,1071.16 1102.05,1089.3 v1(1102.93,1090.18)
SD2_NCD: J4.88 U1.AA26 | length 23.7
  L1_PS w3: U1.AA26@1161.11,1012.1 1170.81,1002.4 1180.8,1002.4
SD2_NRST: J4.90 R133.2 U1.AB26 | length 23.7
  L1_PS w3: U1.AB26@1161.11,992.42 1170.81,982.72 1180.8,982.72
SD2_VSEL: U1.AG12 U8.29
SD2_WP: J4.86 U1.AA27
SD3_CLK: U1.R26 U4.M6 | length 23.7
  L1_PS w3: U1.R26@1161.11,1130.22 1170.81,1120.52 1180.8,1120.52
SD3_CMD: R118.2 U1.R27 U4.M5
SD3_DATA0: R117.2 U1.M26 U4.A3 | length 23.8
  L1_PS w3: U1.M26@1161.11,1189.27 1171.1,1179.28 1180.8,1179.28
SD3_DATA1: U1.L26 U4.A4 | length 23.7
  L1_PS w3: U1.L26@1161.11,1208.96 1170.81,1199.26 1180.8,1199.26
SD3_DATA2: U1.K26 U4.A5 | length 23.8
  L1_PS w3: U1.K26@1161.11,1228.64 1171.09,1218.66 1180.8,1218.66
SD3_DATA3: U1.N26 U4.B2 | length 23.8
  L1_PS w3: U1.N26@1161.11,1169.58 1171.09,1159.6 1180.8,1159.6
SD3_DATA4: U1.N27 U4.B3
SD3_DATA5: U1.M27 U4.B4
SD3_DATA6: U1.L27 U4.B5
SD3_DATA7: U1.K27 U4.B6
SD3_STROBE: U1.P27 U4.H5
SPDIF_EXT_CLK: J5.63 U1.AF8 | length 23.7
  L1_PS w3: U1.AF8@806.78,913.68 816.54,903.92 816.54,893.99
SPDIF_RX: J5.59 U1.AG9
SPDIF_TX: J5.57 U1.AF9 | length 23.7
  L1_PS w3: U1.AF9@826.47,913.68 836.17,903.98 836.17,893.99
SWOUT_3V3: C410.1 U8.23
SYS_NRST: J5.39 R127.1
SYS_STATUS: Q1.1 U1.P26 | length 23.7
  L1_PS w3: U1.P26@1161.11,1149.9 1170.81,1140.2 1180.8,1140.2
  other v1: 1615.47,1250
TEST_MODE: J4.56 R134.2
TESTMODE: R134.1 R135.1 U1.D26 | length 23.7
  L1_PS w3: U1.D26@1161.11,1346.75 1170.81,1356.45 1180.8,1356.45
TS_RES_EXT: R103.1 U1.J24 | length 19.3
  L1_PS w3: U1.J24@1121.74,1248.32 1121.74,1262.01 v1(1125.7,1265.97)
TS_TEST_OUT: U1.J23 | length 19.1
  L1_PS w3: U1.J23@1102.05,1248.32 1102.05,1264.81 v1(1103.87,1266.63)
UART1_CTS: J8.5 U1.E18 | length 18.4
  L1_PS w3: v1(985.28,1327.22) 985.43,1327.06 U1.E18@1003.63,1327.06
UART1_RTS: J8.13 U1.D18 | length 18.9
  L1_PS w3: v1(985.67,1348.92) 987.83,1346.75 U1.D18@1003.63,1346.75
UART1_RXD: J8.11 U1.E14 | length 18.6
  L1_PS w3: U1.E14@924.89,1327.06 v1(924.89,1345.62)
UART1_TXD: J8.7 U1.F13 | length 19.5
  L1_PS w3: v1(886.83,1304.74) 889.47,1307.38 U1.F13@905.21,1307.38
UART2_RXD: J4.36 U1.F15 | length 19.8
  L1_PS w3: U1.F15@944.57,1307.38 962.29,1307.38 v1(963.76,1305.91)
UART2_TXD: J4.38 U1.E15 | length 19.2
  L1_PS w3: U1.E15@944.57,1327.06 963.02,1327.06 v1(963.58,1327.62)
UART3_CTS: J4.10 U1.A7
UART3_RTS: J4.2 U1.B6 | length 23.8
  L1_PS w3: U1.B6@767.41,1386.12 777.4,1396.11 777.4,1405.81
UART3_RXD: J4.4 U1.D6 | length 19.2
  L1_PS w3: U1.D6@767.41,1346.75 783.23,1346.75 v1(785.61,1349.13)
UART3_TXD: J4.6 U1.B7 | length 23.8
  L1_PS w3: U1.B7@787.09,1386.12 797.08,1396.1 797.08,1405.81
UART4_RXD: J4.40 U1.F19 | length 20.4
  L1_PS w3: U1.F19@1023.31,1307.38 1041.28,1307.38 v1(1043,1305.66)
UART4_TXD: J4.42 U1.F18 | length 18.9
  L1_PS w3: v1(985.59,1305.39) 987.58,1307.38 U1.F18@1003.63,1307.38
USB1_DN: J4.83 U1.A22
USB1_DP: J4.85 U1.B22 | length 23.8
  L1_PS w3: U1.B22@1082.37,1386.12 1092.36,1396.11 1092.36,1405.81
USB1_ID: J4.89 U1.D22 | length 18.1
  L1_PS w3: v1(1064.23,1346.75) U1.D22@1082.37,1346.75
USB1_VBUS: C393.1 J4.81 R108.2
USB2_DN: J4.93 U1.A23
USB2_DP: J4.95 U1.B23 | length 23.8
  L1_PS w3: U1.B23@1102.05,1386.12 1111.97,1396.03 1111.97,1405.81
USB2_ID: J4.99 U1.D23 | length 19
  L1_PS w3: U1.D23@1102.05,1346.75 1103.77,1345.03 v1(1120.31,1345.03)
USB2_VBUS: C394.1 J4.91 R109.2
VDD_1V8: C3.1 C5.1 C21.1 C23.1 C105.1 C106.1 C108.1 C109.1 C130.1 C131.1 C132.1 C133.1 C138.1 C139.1 C241.1 C266.1 C317.1 C370.1 C371.1 C372.1 C384.1 C404.1 J5.22 J5.24 J5.26 J5.28 J5.30 J5.32 J5.34 J5.36 L13.2 R10.1 R11.1 R12.1 R13.1 R14.1 R15.1 R16.1 R17.1 R37.1 R47.2 R79.2 R106.1 R117.1 R118.1 U1.AB13 U1.J11 U1.J12 U1.J13 U1.L19 U1.M19 U1.T19 U1.U19 U1.V19 U1.V20 U1.W12 U2.F1 U2.F12 U2.G4 U2.G9 U2.T4 U2.T9 U2.U1 U2.U12 U4.C6 U4.M4 U4.N4 U4.P3 U4.P5 U5.8 U8.14 | length 502.9
  L1_PS w8: U2.F1@416.56,1009.15 417.68,1008.03 442.48,1008.03 v1(446.83,1012.38)
  L1_PS w10: v1(48.72,1297.99) 56.06,1290.65 U2.U12@70.1,1290.65 ; v1(50.41,1009.15) U2.F12@70.1,1009.15 ; v1(149.27,1048.78) 150.55,1048.78 U2.G9@164.59,1034.74 ; v1(149.33,1249.8) U2.T9@164.59,1265.06 ; v1(306.32,1021.95) 309.28,1021.95 U2.G4@322.07,1034.74 ; v1(306.32,1277.85) 309.28,1277.85 U2.T4@322.07,1265.06 ; U2.U1@416.56,1290.65 v1(436.24,1290.65) ; U1.J11@865.83,1248.32 U1.J12@885.52,1248.32 ; U1.W12@885.52,1051.48 885.52,1033.7 v1(885.6,1033.62) ; v1(886.89,1265.9) 885.52,1264.53 U1.J12@885.52,1248.32 ; v1(887.49,994.6) 889.67,992.42 U1.AB13@905.21,992.42 ; U1.J13@905.21,1248.32 U1.J12@885.52,1248.32 ; U1.V19@1023.31,1071.16 U1.U19@1023.31,1090.84 ; U1.T19@1023.31,1110.53 U1.U19@1023.31,1090.84 ; U1.M19@1023.31,1189.27 U1.L19@1023.31,1208.96 1041.2,1208.96 v1(1041.61,1209.37) ; U1.V20@1043,1071.16 1043,1087.75 v1(1041.63,1089.12) 1039.91,1090.84 U1.U19@1023.31,1090.84 ; v1(1697.8,1156.02) 1697.8,1162.44 1702.6,1167.24 U4.P3@1702.6,1177.31 U4.N4@1722.28,1196.99 ; v1(1720.39,1234.85) 1722.28,1232.96 U4.M4@1722.28,1216.68 ; U4.P5@1741.97,1177.31 1741.97,1162.86 v1(1747.46,1157.37) ; U4.C6@1761.65,1393.84 1769.25,1386.24 1769.25,1378.09 v1(1770.27,1377.07)
  other v1: 1943,1395.24
VDD_3V3: C6.1 C8.1 C30.1 C127.1 C128.1 C129.1 C260.1 C264.1 C311.1 C312.1 C323.2 C403.1 C407.2 J5.21 J5.23 J5.25 J5.27 J5.29 J5.31 J5.33 J5.35 L11.2 R71.2 R72.2 R75.2 R76.2 R95.2 R97.2 R125.1 R146.1 U1.H10 U1.K19 U1.W17 U1.W18 U1.Y10 U4.E6 U4.F5 U4.J10 U4.K9 U8.21 U8.22 U10.1 U10.3 | length 559.9
  L1_PS w10: U1.Y10@846.15,1031.79 861.97,1031.79 v1(863.9,1033.72) ; U1.H10@846.15,1268.01 862.78,1268.01 v1(863.89,1266.9) ; v1(984.23,1032.76) 983.95,1033.04 U1.W17@983.95,1051.48 U1.W18@1003.63,1051.48 ; U1.K19@1023.31,1228.64 1023.31,1236.67 1033.31,1246.67 v1(1033.99,1246.67) ; v1(1723.44,1343.44) 1726.61,1343.44 1735.26,1334.79 U4.F5@1741.97,1334.79 ; U4.E6@1761.65,1354.47 1761.65,1337.53 1763.97,1335.21 v1(1763.97,1331.16) ; U4.K9@1820.71,1256.05 v1(1820.71,1273.9) ; U4.J10@1840.39,1275.73 1856.91,1275.73 v1(1859.98,1272.66)
  L7_GND_3 w10: v1(863.9,1033.72) 863.9,1040.62 873.9,1050.62 972.17,1050.62 984.23,1038.56 v1(984.23,1032.76) 1024.63,1073.16 1024.63,1202.3 ; 1024.61,1202.32 1024.61,1237.29 v1(1033.99,1246.67)
VDD_ARM_0V9: C33.1 C35.1 C36.1 C248.1 C251.1 C253.1 C283.1 C287.1 L6.2 R140.1 R141.2 U1.R13 U1.R15 U1.T13 U1.T14 U1.T15 U1.U13 U1.U15 U1.V13 U1.V15 U1.V16 U1.W13 U1.W14 U1.W15 U1.W16 | length 37.4
  L1_PS w10: v1(962.53,1033.35) 964.26,1035.08 U1.W16@964.26,1051.48 ; U1.V16@964.26,1071.16 v1(982.84,1071.16)
  other v1: 924.89,1070.98 924.98,1092.68 925.89,1127.51
VDD_DRAM&PU_0V9: C20.1 C48.1 C54.1 C55.1 C61.1 C65.1 C74.1 C78.1 C303.1 C304.1 L10.2 R144.1 R145.2 U1.J10 U1.K12 U1.K13 U1.L10 U1.L11 U1.L13 U1.M13 U1.M14 U1.N10 U1.N11 U1.P9 U1.P12 U1.R10 U1.R11 U1.U10 U1.U11 U1.V12 U1.W10 U1.W11 | length 298.6
  L1_PS w10: U1.W10@846.15,1051.48 U1.U10@846.15,1090.84 ; U1.R10@846.15,1130.22 846.15,1112.36 v1(844.4,1110.61) 846.15,1108.86 U1.U10@846.15,1090.84 ; U1.U11@865.83,1090.84 U1.U10@846.15,1090.84 ; U1.R11@865.83,1130.22 865.83,1148.45 v1(867.14,1149.76) ; U1.N11@865.83,1169.58 865.83,1151.07 v1(867.14,1149.76) ; U1.L11@865.83,1208.96 865.83,1227.08 v1(867.15,1228.4) 867.39,1228.64 U1.K12@885.52,1228.64 U1.K13@905.21,1228.64 U1.L13@905.21,1208.96 U1.M13@905.21,1189.27 U1.M14@924.89,1189.27 v1(924.89,1208.1) ; U1.P12@885.52,1149.9 867.28,1149.9 v1(867.14,1149.76) ; v1(922.17,1229.81) v1@924.89,1232.53
  other v1: 867.31,1071.16 844.72,1189.89
VDD_PHY_0V9: C1.1 C360.1 U1.J14 U8.1 | length 18.1
  L1_PS w8: v1(923.47,1265.85) 924.89,1264.43 U1.J14@924.89,1248.32
VDD_PHY_1V2: C244.1 C405.1 C408.1 U1.J15 U10.5 | length 26.4
  L1_PS w10: U1.J15@944.57,1248.32 962.86,1266.61 v1(963.4,1266.61)
VDD_SNVS_0V8: C9.1 C337.1 R113.1 U1.K22 U8.2 | length 19
  L1_PS w10: v1(1081.98,1209.79) 1082.37,1210.18 U1.K22@1082.37,1228.64
VDD_SOC_0V8: C15.1 C16.1 C234.2 C235.1 C247.1 C254.1 C255.1 C256.1 C275.1 C285.1 L5.2 R142.1 R143.2 U1.J16 U1.J17 U1.K15 U1.K16 U1.L15 U1.L17 U1.L18 U1.M15 U1.N13 U1.N15 U1.N17 U1.N18 U1.P16 U1.R17 U1.R18 U1.U17 U1.U18 | length 328.6
  L1_PS w10: U1.K15@944.57,1228.64 U1.L15@944.57,1208.96 U1.M15@944.57,1189.27 U1.N15@944.57,1169.58 U1.P16@964.26,1149.9 965.05,1150.69 v1(982.31,1150.69) ; U1.U17@983.95,1090.84 U1.U18@1003.63,1090.84 1005.14,1092.35 v1(1005.14,1110.33) 1005.14,1128.71 U1.R18@1003.63,1130.22 1004.84,1131.43 v1(1004.84,1150.24) ; U1.R17@983.95,1130.22 982.31,1131.86 v1(982.31,1150.69) ; U1.N17@983.95,1169.58 982.31,1167.94 v1(982.31,1150.69) ; U1.L17@983.95,1208.96 U1.L18@1003.63,1208.96 1003.82,1208.77 v1(1003.82,1189.45) 1003.63,1189.26 U1.N18@1003.63,1169.58 1004.84,1168.37 v1(1004.84,1150.24) ; v1(982.31,1150.69) 982.76,1150.24 v1(1004.84,1150.24)
  other v1: 925.1,1171.42 985.62,1227.04 1005.62,1226.93
VDDA_1V8: C99.1 C100.1 C101.1 C104.1 C265.1 C267.1 C363.1 C400.1 U1.AA14 U1.G14 U1.H13 U1.H15 U1.N19 U1.N20 U1.P5 U1.P19 U1.R19 U1.Y15 U8.54 | length 236.4
  L1_PS w8: U1.H13@905.21,1268.01 905.21,1270.22 922.69,1287.7 U1.G14@924.89,1287.7 U1.H15@944.57,1268.01
  L1_PS w10: v1(727.89,1150.9) 746.73,1150.9 U1.P5@747.73,1149.9 ; U1.AA14@924.89,1012.1 924.02,1012.97 v1(924.02,1032.9) 925.13,1031.79 U1.Y15@944.57,1031.79 ; U1.G14@924.89,1287.7 v1(924.89,1305.9) ; U1.R19@1023.31,1130.22 U1.P19@1023.31,1149.9 ; U1.P19@1023.31,1149.9 1042.81,1149.9 v1(1043.56,1150.65) 1043.56,1169.02 U1.N20@1043,1169.58 U1.N19@1023.31,1169.58 U1.P19@1023.31,1149.9
VINT: C406.1 U8.4
VSYS_5V: C10.1 C11.1 C12.1 C13.1 C279.2 C281.2 C295.2 C301.2 C306.2 C307.2 C316.2 C401.2 C402.2 J5.1 J5.2 J5.3 J5.4 J5.5 J5.6 J5.7 J5.8 J6.1 U8.16 U8.17 U8.18 U8.33 U8.34 U8.35 U8.47 U8.48 U8.49 U8.53 U8.56
WDOG_B: R55.1 U1.AG13
WL_REG_ON: J8.6 U1.R23 | length 17.9
  L1_PS w3: v1(1102.05,1112.36) U1.R23@1102.05,1130.22
WL_WAKE_DEV: J8.2 U1.U27
WL_WAKE_HOST: J8.4 U1.W26 | length 23.8
  L1_PS w3: U1.W26@1161.11,1051.48 1171.1,1041.49 1180.8,1041.49
XIN_32K: C298.1 QZ2.2 R57.1 U8.10
XOUT_32K: C299.1 QZ2.1 R57.2 U8.11
XTALI_24M: C123.1 R26.1 U1.B27 Y1.3
XTALI_32K: R100.2 U1.A26
XTALO_24M: C124.1 R26.2 U1.C26 Y1.1 | length 23.8
  L1_PS w3: U1.C26@1161.11,1366.44 1170.99,1376.32 1180.8,1376.32
XTALO_32K: R113.2 U1.B25 | length 23.8
  L1_PS w3: U1.B25@1141.43,1386.12 1151.26,1395.95 1151.26,1405.81
pads on no net: J4. J8.24 U1.AB6 U1.F6 U1.J5 U1.K5 U1.M1 U1.M2 U1.N1 U1.N2 U1.N6 U1.R2 U1.R6 U1.T1 U1.T2 U1.V5 U1.W5 U2.A1 U2.A2 U2.A11 U2.A12 U2.AA1 U2.AA12 U2.AB1 U2.AB2 U2.AB11 U2.AB12 U2.B1 U2.B12 U2.G11 U2.K5 U2.K8 U2.N5 U2.N8 U4.A1 U4.A2 U4.A7 U4.A8 U4.A9 U4.A10 U4.A11 U4.A12 U4.A13 U4.A14 U4.B1 U4.B7 U4.B8 U4.B9 U4.B10 U4.B11 U4.B12 U4.B13 U4.B14 U4.C1 U4.C3 U4.C5 U4.C7 U4.C8 U4.C9 U4.C10 U4.C11 U4.C12 U4.C13 U4.C14 U4.D1 U4.D2 U4.D3 U4.D4 U4.D12 U4.D13 U4.D14 U4.E1 U4.E2 U4.E3 U4.E5 U4.E8 U4.E9 U4.E10 U4.E12 U4.E13 U4.E14 U4.F1 U4.F2 U4.F3 U4.F10 U4.F12 U4.F13 U4.F14 U4.G1 U4.G2 U4.G3 U4.G10 U4.G12 U4.G13 U4.G14 U4.H1 U4.H2 U4.H3 U4.H12 U4.H13 U4.H14 U4.J1 U4.J2 U4.J3 U4.J12 U4.J13 U4.J14 U4.K1 U4.K2 U4.K3 U4.K5 U4.K6 U4.K7 U4.K10 U4.K12 U4.K13 U4.K14 U4.L1 U4.L2 U4.L3 U4.L12 U4.L13 U4.L14 U4.M1 U4.M2 U4.M3 U4.M7 U4.M8 U4.M9 U4.M10 U4.M11 U4.M12 U4.M13 U4.M14 U4.N1 U4.N3 U4.N6 U4.N7 U4.N8 U4.N9 U4.N10 U4.N11 U4.N12 U4.N13 U4.N14 U4.P1 U4.P2 U4.P7 U4.P8 U4.P9 U4.P10 U4.P11 U4.P12 U4.P13 U4.P14 U8.24 U8.25 U8.26 U8.27
copper on no net: | length 72.6
  L1_PS w3: 668.98,1179.42 678.82,1179.42 688.67,1169.58 ; 668.98,1199.11 678.82,1199.11 688.67,1189.27
  L1_PS w10: 1741.97,1256.05 v1(1759.72,1238.3)
  other v1: 276.4,1100.82 766.88,1113.22 228,1180 765.6,1188.9 253.13,1204.68
  other v2: 240,1103

## Polygon pours and split planes (outlines as drawn)
VDD_SOC_0V8 on L1_PS "TOP-VDD_SOC_0V8 1" (solid, remove dead copper, pour order 66): 960.89,1253.9 1004.89,1253.9 1010.89,1247.9 1010.89,1239.9 1013.89,1236.9 1013.89,1089.9 1008.89,1084.9 979.89,1084.9 976.89,1087.9 976.89,1091.9 981.89,1096.9 989.89,1096.9 995.89,1102.9 995.89,1120.9 991.89,1124.9 981.89,1124.9 942.99,1163.8 901.55,1163.8 898.97,1166.38 898.97,1173.47 904.12,1178.62 904.55,1178.19 932.26,1178.19 938.89,1184.82 938.89,1231.9
VDD_DRAM&PU_0V9 on L1_PS "TOP-VDD_DRAM&PU_0V9" (solid, remove dead copper, pour order 65): 837.89,1253.9 849.89,1253.9 853.89,1249.9 853.89,1242.9 857.89,1238.9 908.89,1238.9 918.89,1248.9 918.89,1251.9 921.89,1254.9 926.89,1254.9 933.89,1247.9 933.89,1188.9 928.89,1183.9 901.89,1183.9 898.89,1186.9 898.89,1215.9 893.89,1220.9 876.89,1220.9 874.89,1218.9 874.89,1207.9 870.89,1203.9 858.89,1203.9 854.89,1199.9 854.89,1178.9 859.89,1173.9 868.89,1173.9 874.89,1167.9 874.89,1160.9 879.89,1155.9 887.89,1155.9 890.89,1152.9 890.89,1145.9 887.89,1142.9 878.89,1142.9 870.89,1134.9 870.89,1126.9 867.89,1123.9 859.89,1123.9 853.89,1117.9 853.89,1101.9 858.89,1096.9 866.89,1096.9 890.89,1072.9 890.89,1067.9 868.89,1045.9 844.89,1045.9 839.89,1050.9 839.89,1102.9 835.89,1106.9 835.89,1115.9 840.89,1120.9 840.89,1137.9 834.89,1143.9 825.89,1143.9 821.89,1147.9 821.89,1154.9 825.89,1158.9 831.89,1158.9 835.89,1162.9 835.89,1184.9 835.89,1251.9
NVCC_DRAM_1V1 on L1_PS "TOP-NVCC_DRAM_1V1" (solid, remove dead copper, pour order 64): 797.89,1042.9 795.89,1044.9 795.89,1069.9 792.89,1072.9 792.89,1127.9 794.89,1129.9 794.89,1139.9 793.89,1140.9 765.89,1140.9 760.89,1145.9 760.89,1153.9 765.89,1158.9 792.89,1158.9 794.89,1160.9 794.89,1190.9 798.89,1194.9 798.89,1205.9 796.89,1207.9 796.89,1246.9 804.89,1254.9 816.89,1254.9 823.89,1261.9 832.89,1261.9 836.39,1258.4 836.39,1245.4 831.89,1240.9 831.89,1165.9 829.89,1163.9 821.89,1163.9 818.89,1160.9 818.89,1144.9 827.89,1135.9 829.89,1135.9 830.89,1134.9 830.89,1067.9 830.39,1067.4 830.39,1060.9 834.89,1056.4 834.89,1051.9 828.89,1045.9 815.89,1045.9 812.89,1042.9
VDD_ARM_0V9 on L1_PS "TOP-VDD_ARM_0V9" (solid, remove dead copper, pour order 63): 901.57,1135.79 947.21,1135.79 954.76,1128.24 954.76,1085.57 960.32,1080.01 987.56,1080.01 991.69,1075.88 991.69,1062.33 989.41,1060.05 974.3,1060.05 971.44,1057.19 971.44,1041.93 971.58,1041.79 971.58,1029.38 966.59,1024.39 958.32,1024.39 953.19,1029.52 953.19,1038.65 945.34,1046.5 902.27,1046.5 895.57,1053.2 895.57,1129.79
GND on L1_PS "TOP-GND 4" (solid, remove dead copper, pour order 62): 878.89,1214.9 887.89,1214.9 894.89,1207.9 894.89,1166.9 901.89,1159.9 942.89,1159.9 983.89,1118.9 985.89,1118.9 990.89,1113.9 990.89,1104.9 986.89,1100.9 978.89,1100.9 968.89,1090.9 968.89,1087.9 967.89,1086.9 961.89,1086.9 958.89,1089.9 958.89,1130.9 949.89,1139.9 900.89,1139.9 891.89,1130.9 891.89,1087.9 890.89,1086.9 882.89,1086.9 869.89,1099.9 863.89,1099.9 857.89,1105.9 857.89,1115.9 861.89,1119.9 871.89,1119.9 876.89,1124.9 876.89,1131.9 880.89,1135.9 885.89,1135.9 894.89,1144.9 894.89,1154.9 887.89,1161.9 884.89,1161.9 877.89,1168.9 877.89,1171.9 871.89,1177.9 863.89,1177.9 856.89,1184.9 856.89,1194.9 859.89,1197.9 872.89,1197.9 877.89,1202.9 877.89,1213.9
GND on L1_PS "TOP-GND 2" (solid, remove dead copper, pour order 61): 776.5,1048.5 780.89,1052.9 788.89,1052.9 793.89,1047.9 793.89,1039.91 793.9,1039.9 797.89,1035.9 812.89,1035.9 817.89,1040.9 829.89,1040.9 833.89,1036.9 833.89,1023.9 837.89,1019.9 845.89,1019.9 848.89,1016.9 848.89,1006.9 845.89,1003.9 827.89,1003.9 823.89,1007.9 808.89,1007.9 803.89,1002.9 782.1,1002.9 765,1020 765,1029 776.5,1040.5
GND on L1_PS "TOP-GND 3" (solid, remove dead copper, pour order 60): 997.57,1009.35 997.57,1038.43 1066.75,1038.43 1066.75,1009.35
GND on L1_PS "TOP-GND 1" (solid, remove dead copper, pour order 59): 957.89,1215.9 964.89,1215.9 980.89,1199.9 985.89,1199.9 990.89,1194.9 990.89,1184.9 986.89,1180.9 981.89,1180.9 965.89,1164.9 960.89,1164.9 955.89,1169.9 955.89,1213.9
GND on L2_GND_1 "GND_L02_P067" (solid, remove dead copper, pour order 67): 95.15,2000.03 ccw(c95.15,1904.95) 0.07,1904.95 0.07,100.03 ccw(c100.07,100.03) 100.07,0.03 2630.03,0.03 ccw(c2630.03,100) 2730,100 2730,1900.03 ccw(c2630,1900.03) 2630,2000.03
GND on L7_GND_3 "GND_L07_P068" (solid, remove dead copper, pour order 68): 95.15,2000.03 ccw(c95.15,1904.95) 0.07,1904.95 0.07,100.03 ccw(c100.07,100.03) 100.07,0.03 2630.03,0.03 ccw(c2630.03,100) 2730,100 2730,1900.03 ccw(c2630,1900.03) 2630,2000.03

## Keep-outs
L8_SS:
  region: 1234,104 cw(c1284,103.5) 1234,103 1256,103 1256,102 1263,102 1264,97 ccw(c1283.93,103.41) 1263,103 1257,103 1257,104
Keep-Out Layer:
  region: 1960,220 2656,220 2656,880 1960,880

## Silkscreen, mask and mechanical layers (free items; w line width, h text height)
Top Overlay:
  text "STATUS" at 1525,1805 h30
  text ".ProjectNameShort" at 2110,1585 h100
  text "CPU" at 655,1475 h30
  text "LPDDR4" at 160,1470 h30
  text "eMMC" at 1735,990 h30
  text "PMIC" at 80,695 h30
  text "5V0" at 870,160 h30
  text "GND" at 985,160 h30
Board Layer Stack Bottom Overlay:
  circle w4: c1088.5,679.88 r5
  circle w4: c1104.83,572.48 r2.6
  circle w4: c1104.83,572.48 r11.73
  lines w4: 1054.36,698.82 1198.7,550.21 ; 1063.16,551.34 1202.03,701.15 ; 1093.23,673.22 1084.36,673.02 1174.9,673.02 ; 1093.23,674.08 1093.23,674.42 1101.03,586.48 ; 1117.56,569.94 1153.03,569.94 1153.03,578.21 1161.5,677.88 ; 1143.5,563.21 1143.5,566.54 ; 1146.83,676.55 1146.83,686.55 ; 1046.83,539.88 1046.83,706.55 1213.5,706.55 1213.5,539.88 1046.83,539.88 ; 1083.49,650.75 1095.16,650.75 1094.36,663.42 1083.49,663.42 1083.49,650.75 ; 1094.7,680.09 cw(c1111.3,660.88) 1112.83,686.22 1094.7,680.08 ; 1111.16,640.68 1134.23,640.68 1134.23,646.88 1111.16,646.88 1111.16,640.68 ; 1113.23,684.28 1113.23,690.68 1136.3,690.68 1136.3,684.28 1113.23,684.28 ; 1136.9,686.55 cw(c1135.71,640.75) 1161.5,678.62 1136.9,686.55
  lines w5.33: 745.82,777.88 cw(c745.82,756.75) 761.82,770.55 ; 754.49,799.22 cw(c754.48,782.55) 759.16,798.55 ccw(c763.97,815.01) 763.16,797.88 ccw(c768.16,904.96) 773.16,797.88 ccw(c769.61,873.35) 789.82,800.56 cw(c797.6,772.48) 815.82,795.21 ; 761.83,770.55 ccw(c777.38,783.95) 766.49,766.55 790.49,758.55 cw(c790.49,741.87) 807.16,742.55 ccw(c810.98,743.99) 813.16,740.54 813.83,741.88 ccw(c803.63,746.98) 813.17,753.22 ; 795.16,767.88 cw(c792.1,747.67) 808.49,759.88 cw(c696.75,676.67) 813.16,753.21 ; 809.17,776.56 ccw(c922.88,920.99) 819.17,769.22 ccw(c823.89,776.15) 822.5,767.88 826.5,767.22 ; 815.83,795.21 cw(c809.25,786.99) 819.16,790.55 ccw(c828.22,793.76) 823.83,785.21 ; 823.82,756.55 cw(c833.9,758) 824.49,761.89 ccw(c733.83,798.94) 826.49,767.21 ; 823.83,756.55 825.16,747.21 823.16,743.21 ccw(c826.16,741.66) 828.49,739.21 ; 823.83,785.22 827.16,782.55 831.16,779.22 cw(c823.9,770.5) 835.17,771.89 835.16,771.22 834.5,768.55 833.83,764.55 833.16,759.22 833.16,750.55 cw(c817.08,750.55) 828.49,739.22
  lines w6.66: 709.82,715.88 836.5,797.22 ; 877.16,715.88 711.82,715.88 793.83,881.89 877.83,715.88
  lines w8: 2053,1121 2715,1121 2715,955 2054,955 2054,1121 ; 2015,40 2015,210 2025,210 2670,210 2670,40 2015,40 ; 2053,1130 2053,1295 2720,1295 2720,1130 2053,1130
  text "QSPI" at 2080,1610 h30
  text "GND" at 1058.55,132.19 h30
  text "5V0" at 949.98,131.29 h30
Top Solder:
  text "i.MX 8M MINI" at 1085.29,68.77 h50
Dimension:
  lines w5: 0.07,100.03 ccw(c100.07,100.03) 100.07,0.03 1799.96,0.03 cw(c1760.61,-91.89) 1800.03,0 2600,0 2630,0 ccw(c2630,100) 2730,100 2730,1900.03 ccw(c2630,1900.03) 2630,2000.03 2600,2000.03 1900,2000.03 100.07,2000.03 ccw(c100.07,1900.03) 0.07,1900.03 0.07,100.03 ; 1980,240 2636.98,240 2636.98,860 1980,860 1980,240
Top Designator:
  lines w1: -25,0 25,0 ; 0,-25 0,25

## Dimensions
2730,1900.03 to 0.07,1900.03 on Dimension
2630,2000.03 to 2630,0 on Dimension